# Allegro board mib_fp_jtag_serial_20.brd
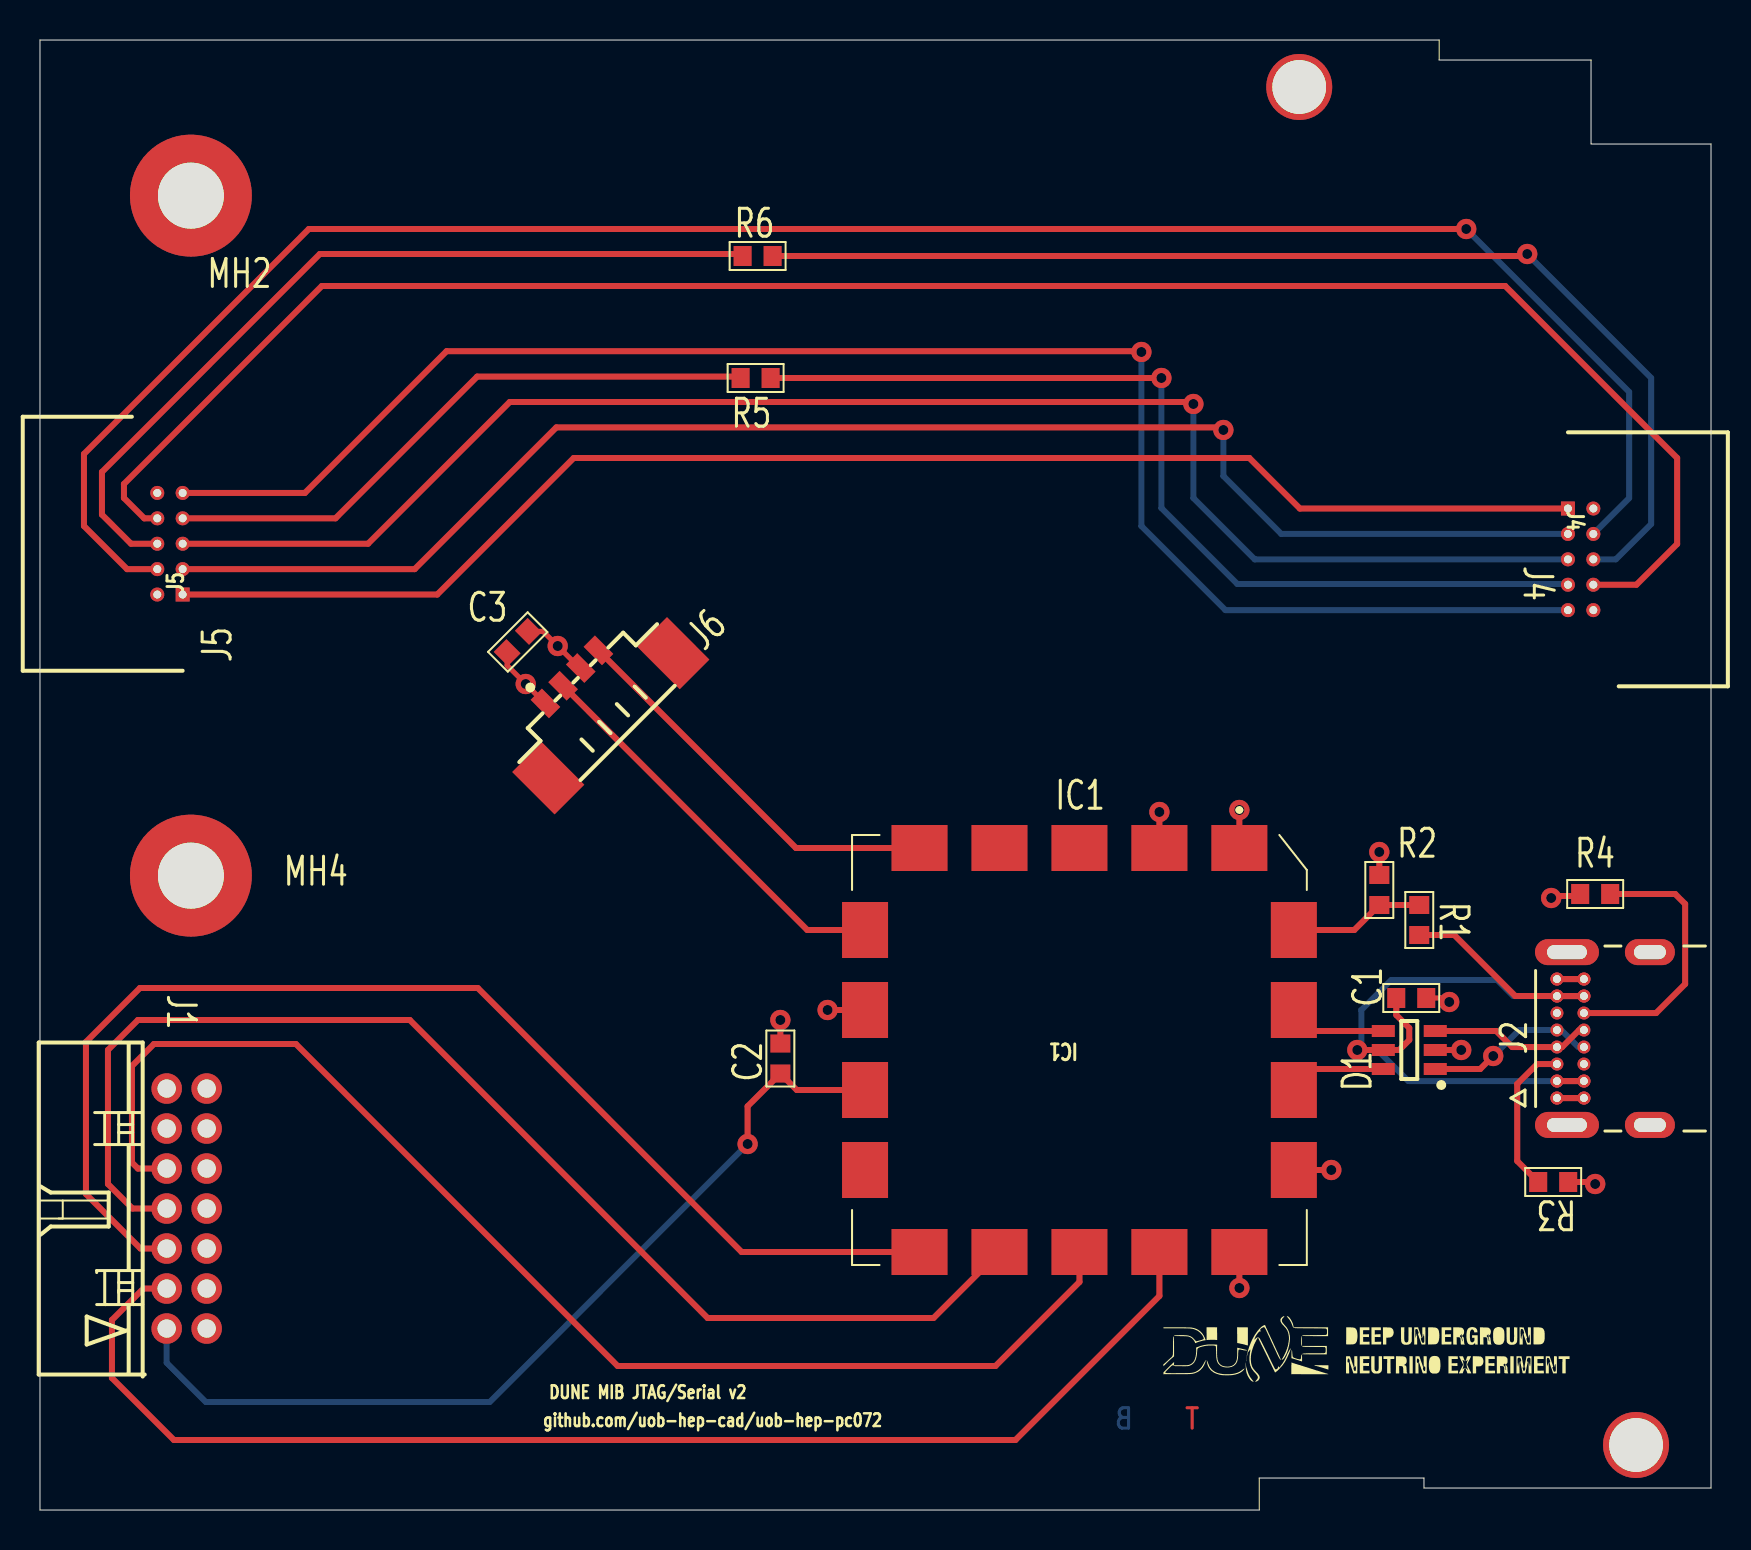
[diagram p0: board, top side]
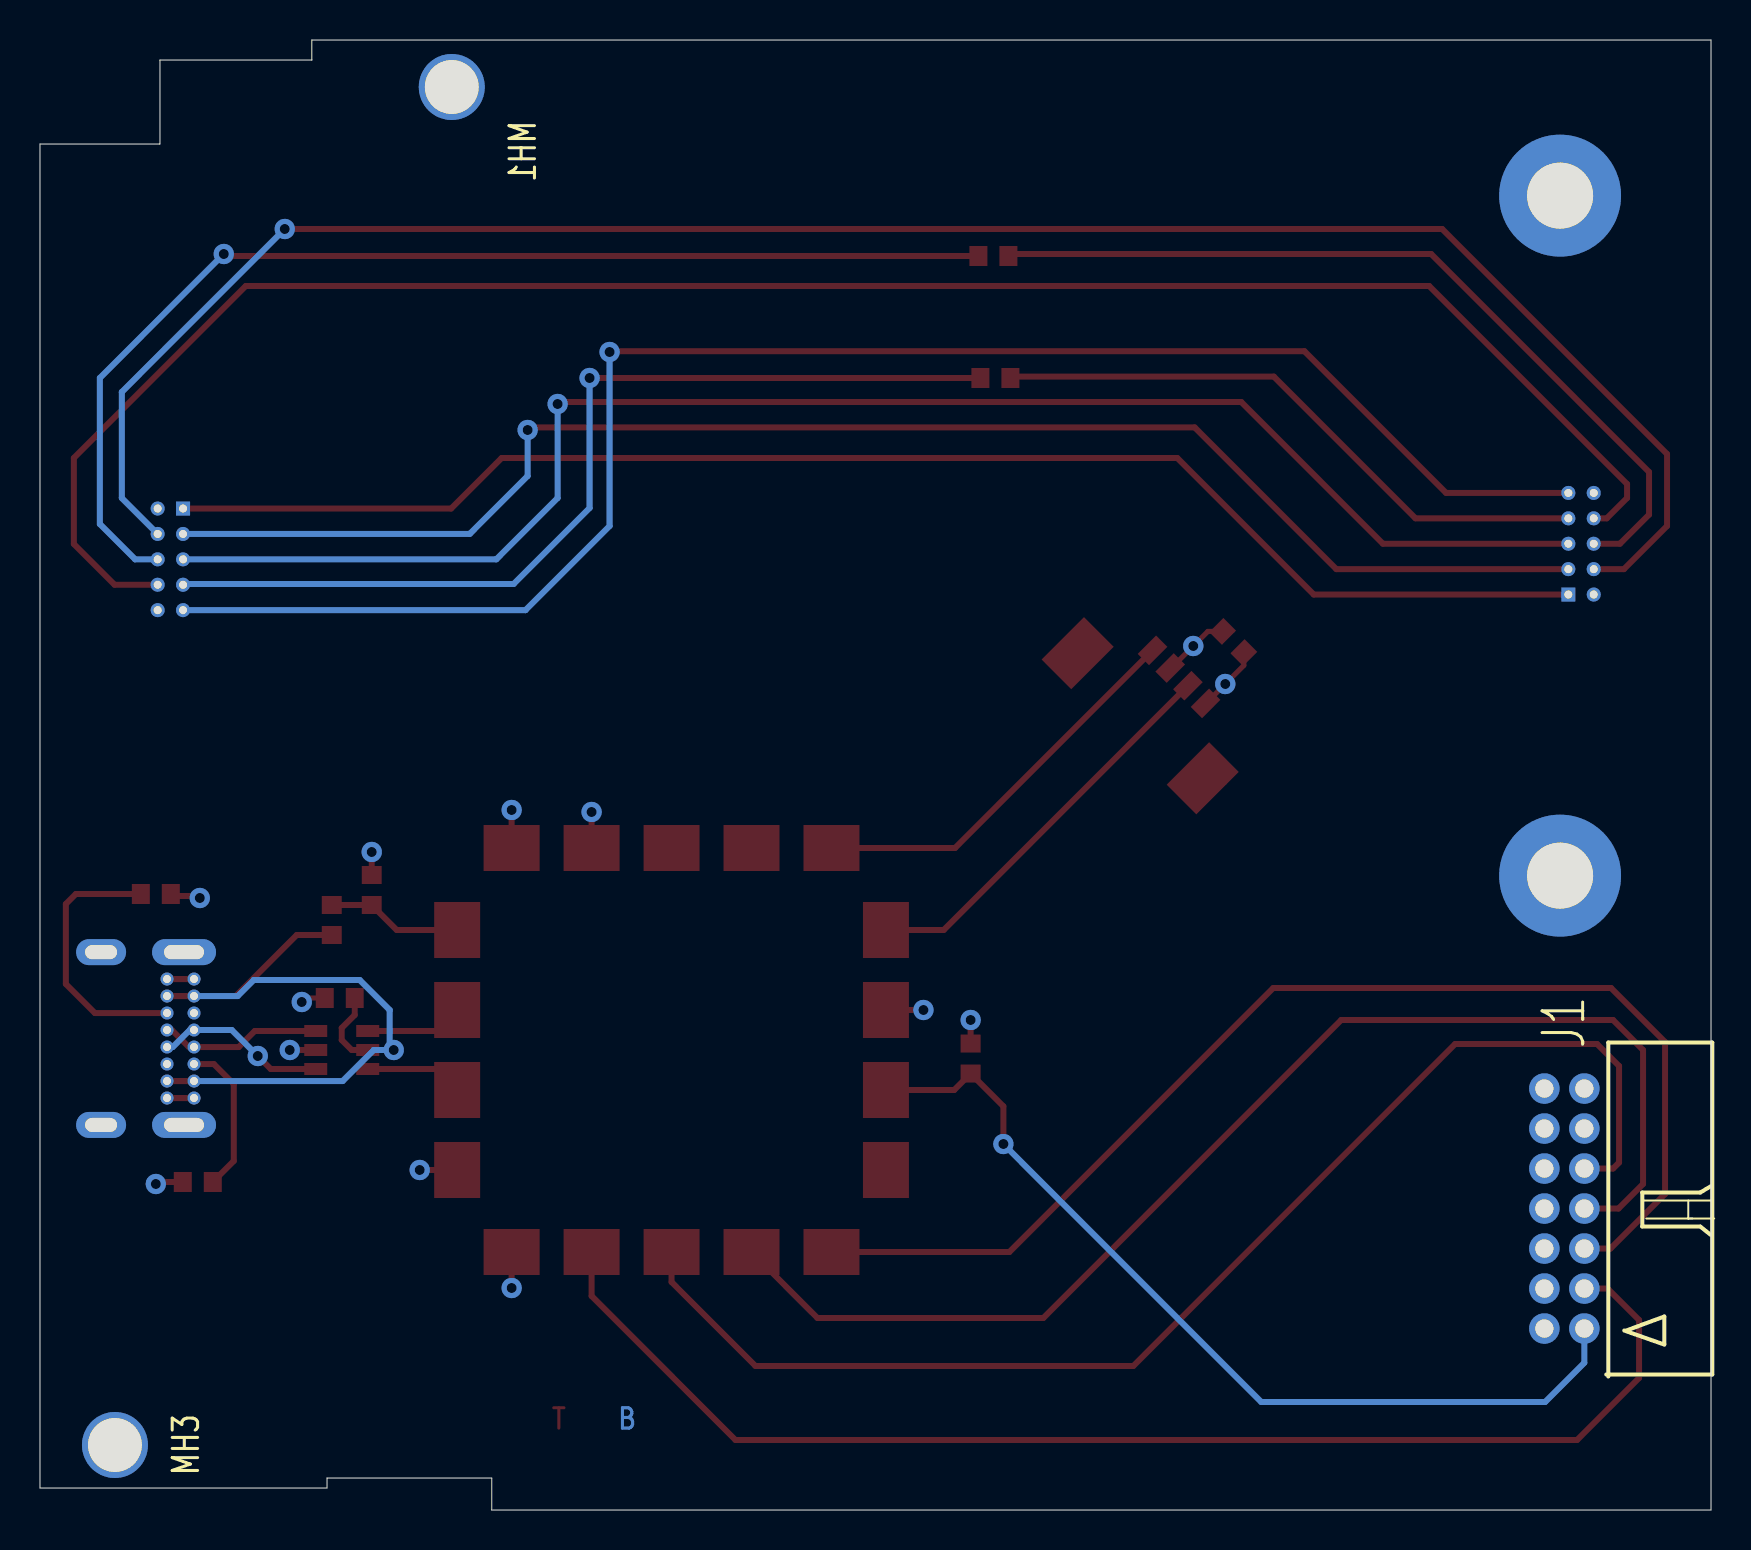
[diagram p1: board, bottom side, seen from below]

Outline 83.59 x 73.5 mm; copper layers: TOP, 02_GND, 03_VCC, BOTTOM. Coordinates in mm from the lower left corner of the outline.
Outline path: 0,73.5 70,73.5 70,72.5 77.59,72.5 77.59,68.3 83.59,68.3 83.59,1.1 69.24,1.1 69.24,1.6 61,1.6 61,0 0,0 0,73.5

## Design rules (mm)
constraint set DEFAULT: min track width 0.127

## Placement (name value [footprint] x y rotation side)
C1  100nF  [C0603]  68.6 25.6 180 top
C2  100nF  [C0603]  37.04 22.57 90 top
C3  100nF  [C0603]  23.9 43.4 45 top
D1  -  [SOT95P280X145-6N]  68.5 23 180 top
IC1  -  [410357B]  52 23 180 top
J1  -  [CONMOLEX14MC_2MM]  8.34 9.07 180 top
J2  -  [MOLEX_2137160001]  83.54 23.57 90 top
J4  -  [SHDRRA10W41P127_2X5_1270X546X533P]  76.44 50.07 270 top
J5  -  [SHDRRA10W41P127_2X5_1270X546X533P]  7.14 45.77 90 top
J6  -  [MOLEX_53398-0471]  27 39.5 45 top
MH1  MT_HOLE  [MOUNTHOLE]  63 71.15 180 bottom
MH2  MT_HOLE  [MOUNTHOLE]  7.55 65.72 0 top
MH3  MT_HOLE  [MOUNTHOLE]  79.84 3.25 180 bottom
MH4  MT_HOLE  [MOUNTHOLE]  7.55 31.72 0 top
NOREF  -  []  61 0.73 0 top
NOREF#2  -  []  0 73.5 0 top
NOREF#3  -  []  56.2 6.4 0 top
NOREF#4  -  []  60.37 0 90 top
NOREF#5  -  []  70 73.04 0 top
NOREF#6  -  []  -97 0 0 top
NOREF#7  -  []  81.31 68.3 90 top
NOREF#8  -  []  0 0 90 top
R1  4.7k  [C0603]  69 29.5 270 top
R2  10k  [C0603]  67 31 270 top
R3  4.7k  [C0603]  75.7 16.4 180 top
R4  4.7k  [C0603]  77.8 30.8 0 top
R5  XX  [C0603]  35.8 56.6 180 top
R6  XX  [C0603]  35.9 62.7 0 top

## Library data of the parts
C1-C3 = CAPCERSMDCL2: part number: CAPCERSMDCL2_0603-100NF,16V; tolerance: 10%
D1 = USBLC6-2: part number: USBLC6-2SC6
IC1 = 410_357_B: part number: 410_357_B-DIGILENT,410-357-B
J1 = CON14P: part number: CON14P-MOLEX_87833
J2 = CON16P_USB_C_USB2: part number: CON16P_USB_C_USB2-2137160001
J4 J5 = SHF-105-01-L-D-RA: part number: SHF-105-01-L-D-RA-SHF-105-01-L-D-RA
J6 = CON4P: part number: CON4P-53398-0471
MH1 MH2 = MT_HOLE: part number: MT_HOLE-MT_HOLE,MT_HOLE; room: TE0712
MH3 MH4 = MT_HOLE: part number: MT_HOLE-MT_HOLE,MT_HOLE
R1 R3 R4 = RSMD0603: part number: RSMD0603_1/10W-4.7K,1%; tolerance: 1%
R2 = RSMD0603: part number: RSMD0603_1/10W-10K,1%; tolerance: 1%
R5 R6 = RSMD0603: part number: RSMD0603_1/16W-XX,5%; tolerance: 5%

## Footprints (pads in the part's own frame, mm; a bottom-side part is the same pattern mirrored in y, then rotated)
410357B
  rect 2.8x2.3 smd: 1(-8,-10.1) 2(-4,-10.1) 3(0,-10.1) 4(4,-10.1) 5(8,-10.1) 10(8,10.1) 11(4,10.1) 12(0,10.1) 13(-4,10.1) 14(-8,10.1)
  rect 2.3x2.8 smd: 6(10.725,-6) 7(10.725,-2) 8(10.725,2) 9(10.725,6) 15(-10.725,6) 16(-10.725,2) 17(-10.725,-2) 18(-10.725,-6)
C0603
  rect 0.9x1 smd: 1(-0.75,0) 2(0.75,0)
CONMOLEX14MC_2MM
  round 1.524 hole 0.914: 1(0,0) 2(2,0) 3(0,-2) 4(2,-2) 5(0,-4) 6(2,-4) 7(0,-6) 8(2,-6) 9(0,-8) 10(2,-8) 11(0,-10) 12(2,-10) 13(0,-12) 14(2,-12)
MOLEX_53398-0471
  rect 2.1x3 smd: (-3.175,-0.95) (5.675,-0.95)
  rect 0.8x1.3 smd: 1(-0.625,1.8) 2(0.625,1.8) 3(1.875,1.8) 4(3.125,1.8)
MOLEX_2137160001
  round 0.648 hole 0.4: A1(-2.975,7.65) A4(-2.125,7.65) A5(-1.275,7.65) A6(-0.425,7.65) A7(0.425,7.65) A8(1.275,7.65) A9(2.125,7.65) A12(2.975,7.65) B1(2.975,6.3) B4(2.125,6.3) B5(1.275,6.3) B6(0.425,6.3) B7(-0.425,6.3) B8(-1.275,6.3) B9(-2.125,6.3) B12(-2.975,6.3)
  oval 1.3x2.5 hole 0.7x1.6: SH1(-4.32,3) SH2(4.32,3)
  oval 1.3x3.2 hole 0.7x2: SH3(-4.32,7.15) SH4(4.32,7.15)
MOUNTHOLE
  round 6.096 hole 3.302: 1(0,0)
SHDRRA10W41P127_2X5_1270X546X533P
  rect 0.7x0.7 hole 0.4: 1(0,0)
  round 0.7 hole 0.4: 2(0,1.27) 3(1.27,0) 4(1.27,1.27) 5(2.54,0) 6(2.54,1.27) 7(3.81,0) 8(3.81,1.27) 9(5.08,0) 10(5.08,1.27)
SOT95P280X145-6N
  rect 1.15x0.6 smd: 1(-1.3,0.95) 2(-1.3,0) 3(-1.3,-0.95) 4(1.3,-0.95) 5(1.3,0) 6(1.3,0.95)

## Nets
GND: C1.1 C2.2(B<0>) C3.1 D1.2 IC1.1 IC1.7 IC1.14 J1.1 J1.3 J1.5 J1.7 J1.9 J1.11 J2.A1 J2.A12 J2.B1 J2.B12 J2.SH1 J2.SH2 J2.SH3 J2.SH4 J4.2 J4.10(A<9>) J5.2 J5.10(A<9>) J6.1 MH1.1(MH_SIG) MH2.1(MH_SIG) MH3.1(MH_SIG) MH4.1(MH_SIG) R2.1 R3.1 R4.1
P5V: C1.2(B<0>) D1.5(VBUS) J2.A4 J2.A9 J2.B4 J2.B9(VBUS4) R1.2(B<0>)
VCC3V3: C3.2(B<0>) IC1.2 IC1.15 J6.3
MMC_RESET*: J4.6 R6.2(B<0>)
MMC_SPARE: J4.7 R5.1
MMC_TCK: J4.1 J5.1
MMC_TDI: J4.9 J5.9
MMC_TDO: J4.3 J5.3
MMC_TMS: J4.5 J5.5
MMC_TRST*: J4.8 J5.8
MP3V3: J4.4 J5.4
TCK: IC1.10 J1.6
TDI: IC1.12 J1.10(A<9>)
TDO: IC1.11 J1.8
TMS: IC1.13 J1.4
UART_RX_TO_FPGA_3V3: IC1.6 J6.2
UART_TX_FROM_FPGA_3V3: IC1.5 J6.4(A<3>)
UNNAMED_1_410357B_I128_VBUSDETE: IC1.18 R1.1 R2.2(B<0>)
UNNAMED_1_CON16PUSBCUSB2_I148_1: J2.B5 R4.2(B<0>)
UNNAMED_1_CON16PUSBCUSB2_I148_2: D1.3 J2.A6 J2.B6
UNNAMED_1_CON16PUSBCUSB2_I148_C: J2.A5 R3.2(B<0>)
UNNAMED_1_CON16PUSBCUSB2_I148_D: D1.1 J2.A7 J2.B7
UNNAMED_1_RSMD0603_I169_B: J5.7 R5.2(B<0>)
UNNAMED_1_RSMD0603_I170_A: J5.6 R6.1
USB_DM: D1.6 IC1.16
USB_DP: D1.4 IC1.17
VREF_JTAG: C2.1 IC1.8(VREF_JTAG) J1.2

Pads without a net: IC1 3 4 9; J1 12 13 14; J2 A8 B8

## Via types
v1: diameter 1.016, hole 0.5, TOP to BOTTOM, 22 vias

## Routing (per net, layer and track width the routed paths; a pad name or vN(x,y) marks a point on that pad's centre or on a via; arc(x,y) is an arc through that point)
GND: length 19.4
  TOP w0.254: J6.1 25.27,40.33 v1(24.3,41.3) 23.37,42.23 C3.1 ; C1.1 70.3,25.6 v1(70.5,25.4)
  TOP w0.3: v1(60,35) IC1.1 ; v1(71.1,23) D1.2 ; v1(60,11.1) IC1.14 ; v1(77.8,16.3) 77.7,16.4 R3.1 ; C2.2 v1(37.04,24.5) ; v1(39.4,25) IC1.7 ; v1(75.6,30.6) 75.7,30.7 76.95,30.7 R4.1 ; v1(67,32.9) R2.1 ; J2.A12 J2.B1 ; J2.A1 J2.B12
P5V: length 39.5
  TOP w0.3: J2.A4 J2.B9 ; R1.2 70.75,28.75 73.8,25.7 75.89,25.7 J2.A9 J2.B4 ; C1.2 67.85,24.75 68.5,24.1 68.5,23.5 68,23 D1.5 v1(65.9,23)
  BOTTOM w0.3: J2.A9 73.7,25.7 72.9,26.5 67.6,26.5 66.1,25 66.1,23.2 v1(65.9,23) 66.9,23 68.45,21.45 J2.A4
VCC3V3: length 7.1
  TOP w0.254: 27.05,42.1 27,42.1 v1(25.9,43.2) 25.17,43.93 C3.2
  TOP w0.3: v1(56,34.9) IC1.2 ; v1(64.6,17) IC1.15
MMC_RESET*: length 57.5
  TOP w0.3: R6.2 74.3,62.7 v1(74.4,62.8)
  BOTTOM w0.3: J4.6 78.83,47.53 80.6,49.3 80.6,56.6 v1(74.4,62.8)
MMC_SPARE: length 48
  TOP w0.3: R5.1 v1(56.1,56.6)
  BOTTOM w0.3: v1(56.1,56.6) 56.1,50.1 59.9,46.3 76.4,46.3 J4.7
MMC_TCK: length 73.2
  TOP w0.3: J4.1 63.03,50.07 60.5,52.6 26.7,52.6 19.87,45.77 J5.1
MMC_TDI: length 82.7
  TOP w0.3: v1(55.1,57.9) 55.06,57.94 20.34,57.94 13.25,50.85 J5.9
  BOTTOM w0.3: v1(55.1,57.9) 55.1,49.2 59.31,44.99 J4.9
MMC_TDO: length 75.8
  TOP w0.3: J5.3 18.74,47.04 25.83,54.13 59.17,54.13 59.2,54.1 v1(59.2,54)
  BOTTOM w0.3: J4.3 62.1,48.8 59.2,51.7 v1(59.2,54)
MMC_TMS: length 78.2
  TOP w0.3: v1(57.7,55.3) 57.6,55.4 23.5,55.4 16.41,48.31 J5.5
  BOTTOM w0.3: J4.5 60.77,47.53 57.7,50.6 v1(57.7,55.3)
MMC_TRST*: length 97.5
  TOP w0.3: J4.8 79.86,46.26 81.9,48.3 81.9,52.6 73.3,61.2 14.1,61.2 4.2,51.3 4.2,50.6 5.22,49.58 J5.8
MP3V3: length 101.3
  TOP w0.3: v1(71.35,64.05) 13.45,64.05 2.2,52.8 2.2,49.2 4.36,47.04 J5.4
  BOTTOM w0.3: v1(71.35,64.05) 79.5,55.9 79.5,50.6 J4.4
TCK: length 61.1
  TOP w0.3: J1.6 5.03,13.07 2.3,15.8 2.3,23.4 5,26.1 21.9,26.1 35.1,12.9 IC1.10
TDI: length 64.5
  TOP w0.3: J1.10 4.9,17.07 4.6,17.37 4.6,22.2 5.7,23.3 12.8,23.3 28.9,7.2 47.8,7.2 52,11.4 IC1.12
TDO: length 62.9
  TOP w0.3: J1.8 4.63,15.07 3.4,16.3 3.4,23 4.9,24.5 18.5,24.5 33.4,9.6 44.7,9.6 IC1.11
TMS: length 65.2
  TOP w0.3: J1.4 5.17,11.07 3.6,9.5 3.6,6.6 6.7,3.5 48.8,3.5 56,10.7 IC1.13
UART_RX_TO_FPGA_3V3: length 20.2
  TOP w0.3: J6.2 38.38,29 IC1.6
UART_TX_FROM_FPGA_3V3: length 20.2
  TOP w0.3: J6.4 37.82,33.1 IC1.5
UNNAMED_1_410357B_I128_VBUSDETE: length 6.8
  TOP w0.3: IC1.18 65.75,29 R2.2 R1.1
UNNAMED_1_CON16PUSBCUSB2_I148_1: length 13.6
  TOP w0.3: J2.B5 80.85,24.85 82.3,26.3 82.3,30.3 81.8,30.8 R4.2
UNNAMED_1_CON16PUSBCUSB2_I148_2: length 8.1
  TOP w0.3: J2.B6 77,24 76.15,23.15 J2.A6 73.65,23.15 72.85,23.95 D1.3
UNNAMED_1_CON16PUSBCUSB2_I148_C: length 7.7
  TOP w0.3: J2.A5 74.9,22.3 73.9,21.3 73.9,17.45 R3.2
UNNAMED_1_CON16PUSBCUSB2_I148_D: length 8.6
  TOP w0.3: D1.1 72.05,22.05 v1(72.7,22.7)
  BOTTOM w0.3: J2.B7 76.95,23.15 76.1,24 J2.A7 75.89,24 74,24 v1(72.7,22.7)
UNNAMED_1_RSMD0603_I169_B: length 30.9
  TOP w0.3: R5.2 34.98,56.67 21.87,56.67 14.78,49.58 J5.7
UNNAMED_1_RSMD0603_I170_A: length 42.1
  TOP w0.3: R6.1 35.05,62.8 14,62.8 3.1,51.9 3.1,49.77 4.56,48.31 J5.6
USB_DM: length 5.1
  TOP w0.3: IC1.16 62.72,21.25 63.53,22.05 D1.6
USB_DP: length 4.9
  TOP w0.3: D1.4 63.78,23.95 IC1.17
VREF_JTAG: length 45.7
  TOP w0.3: IC1.8 37.86,21 C2.1 35.4,20.19 v1(35.4,18.3)
  BOTTOM w0.3: v1(35.4,18.3) 22.5,5.4 8.3,5.4 6.34,7.36 J1.2

## Copper pours and planes (outline as drawn; the poured copper is in the pictures)
GND on 02_GND: 60.36,0.64 0.5,0.64 0.5,72.86 69.36,72.86 69.36,71.86 76.96,71.86 76.96,67.67 82.96,67.67 82.96,1.74 69.87,1.74 69.87,2.23 60.36,2.23 ; 1 cut-out
VCC3V3 on 03_VCC: 60.36,0.64 0.5,0.64 0.5,72.86 69.36,72.86 69.36,71.86 76.96,71.86 76.96,67.67 82.96,67.67 82.96,1.74 69.87,1.74 69.87,2.23 60.36,2.23 ; 1 cut-out

Small or netless copper shapes (teardrops, artwork), in the pictures only: 4 on TOP

## Text on the board
BOTTOM: B
TOP: T
Ref Des/Silkscreen Top: github.com/uob-hep-cad/uob-hep-pc072 | DUNE MIB JTAG/Serial v2
02_GND: 2
03_VCC: 3
User.45: FIGURE | FINISHED_SIZE | 0.4 | 0.5 | 0.9144 | 2.692 | 3.302 | 1.6x0.7 | 2.0x0.7 | DRILL CHART: TOP to BOTTOM | ALL UNITS ARE IN MILLIMETERS | DRILLED_SIZE | - | PLATED | QTY | 16 | 18 | 2 | 22 | 14 | MICRO-TCA INTERFACE BOARD (MIB) front panel ethernet DB | 1. BOARD THICKNESS: 1.57mm | 2. MATERIAL: FR4 (RoHS COMPLIANT MATERIAL) OR EQUIVALENT. GLASS | 3. ALL HOLES ARE PLATED THROUGH UNLESS OTHERWISE NOTED | 5. ALL TOLERANCES +/-3MILS EXCEPT WHERE NOTED
